# Altium PCB PCB.PcbDoc (part 6 of 10)
Units mm, origin at the board's own origin, x right, y up, seen from the top; angles counter-clockwise.
Board outline 100.5 x 147.95 mm, 6 copper layers (Top Layer, Layer 2 (GND), Layer 3, Layer 4, Layer 5 (AGND), Bottom Layer), stack 1.449 mm thick; 511 components, 297 nets, 1620 pads, 565 vias.
Unrouted connection lines stored in the file: 597.
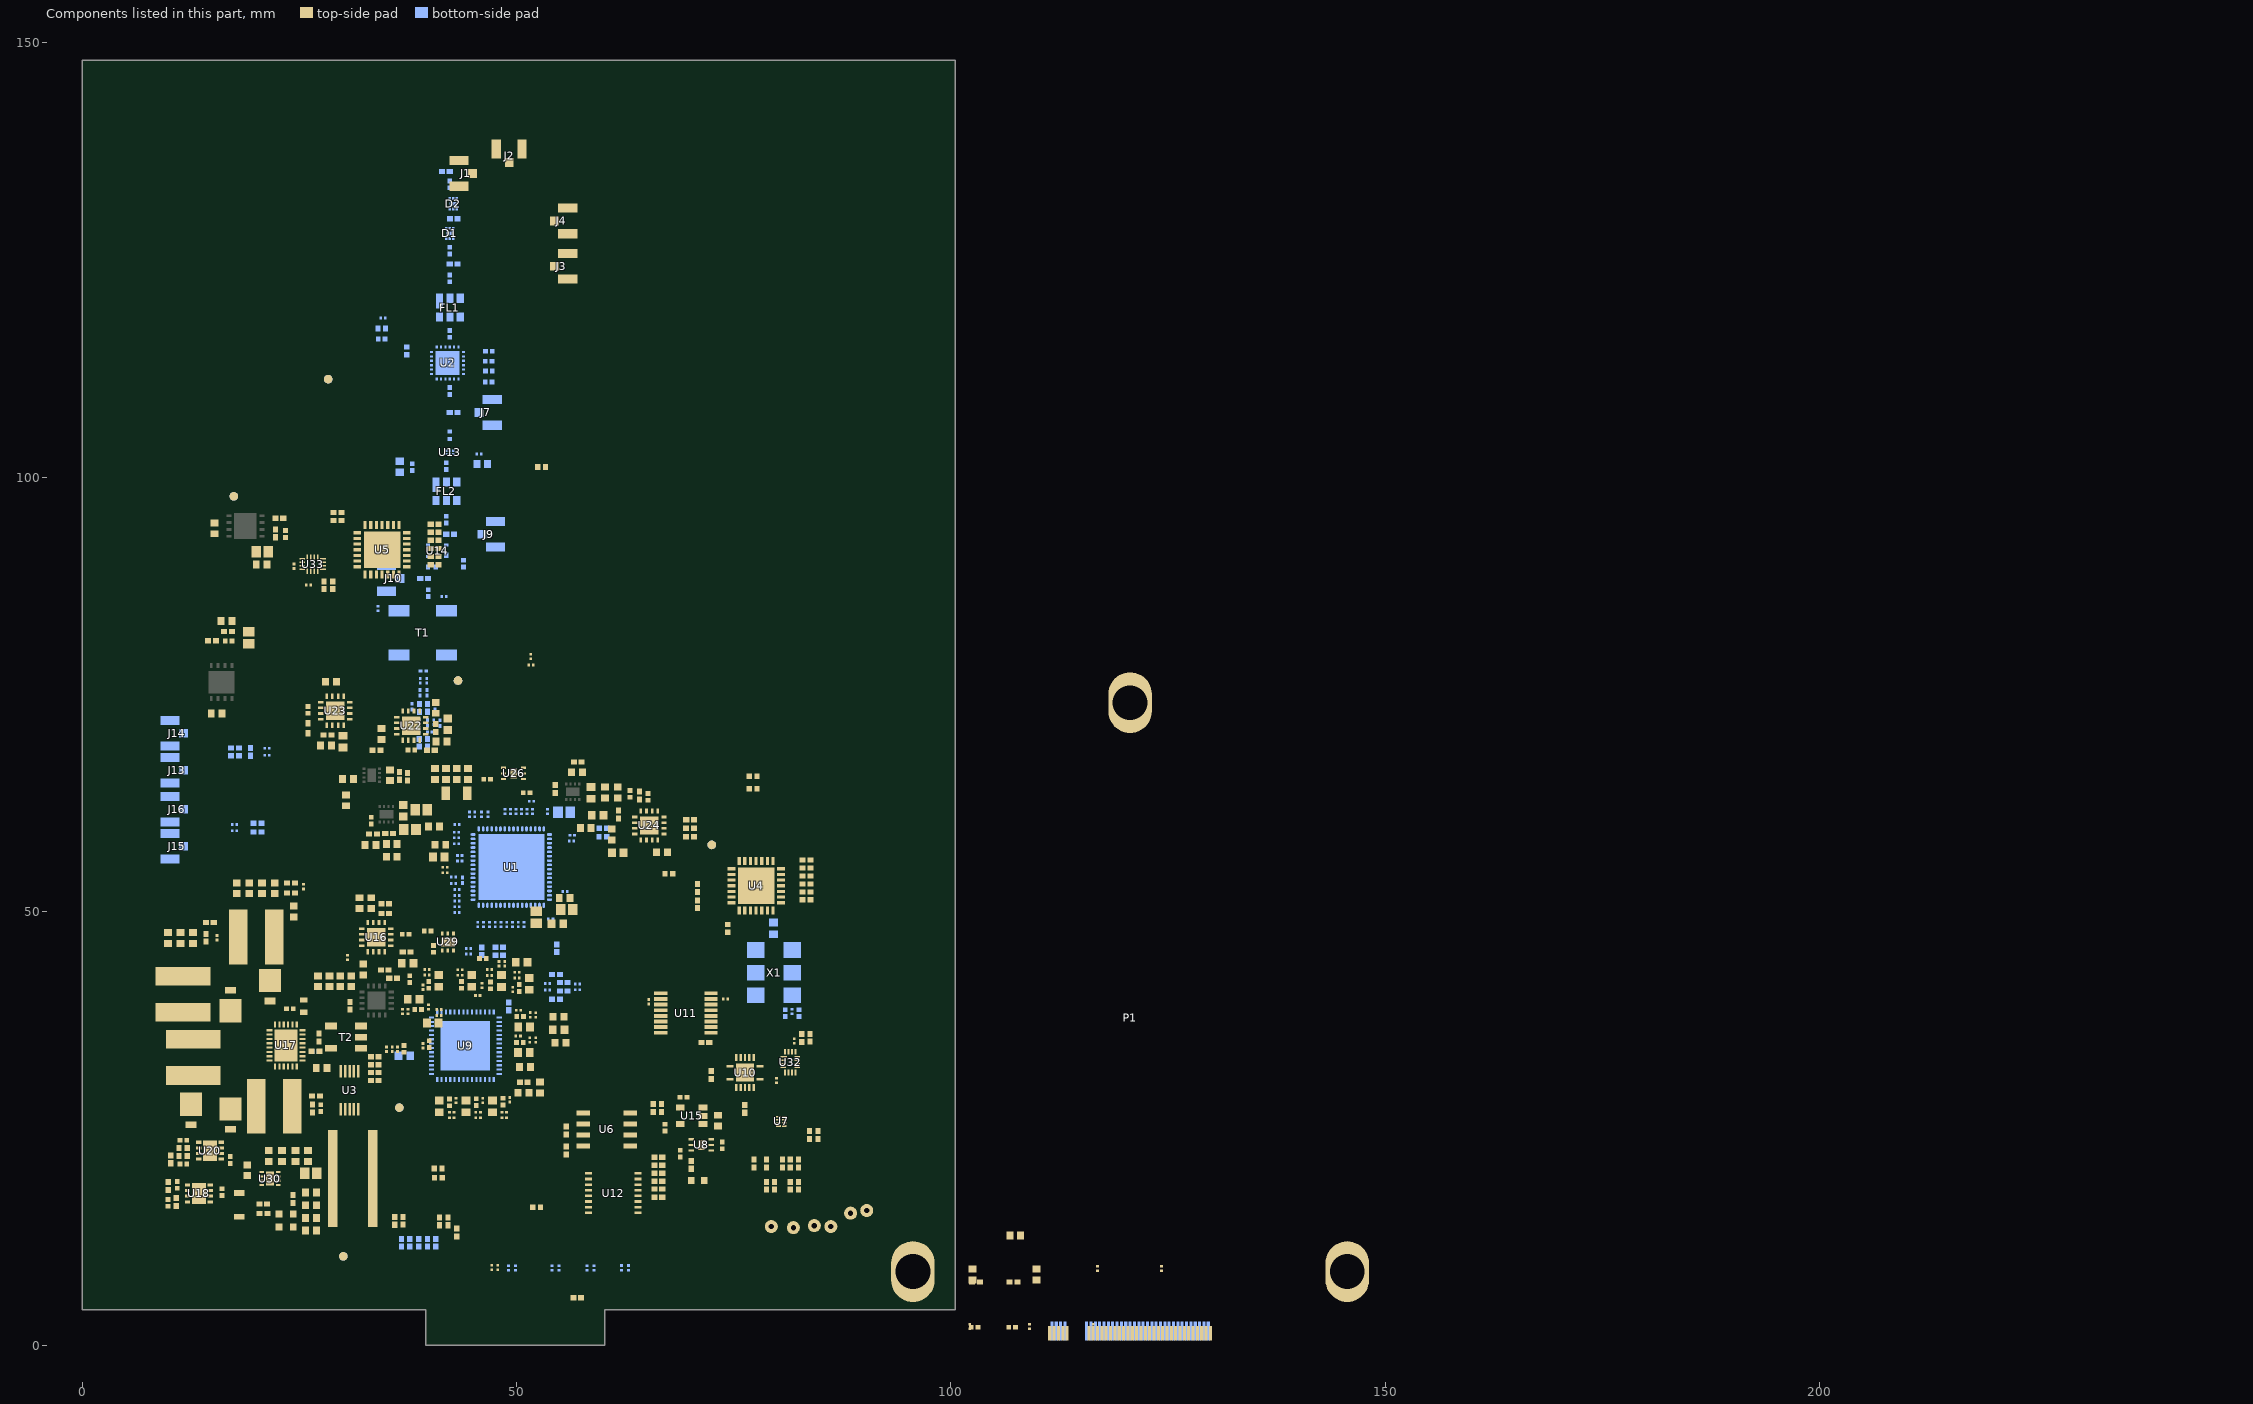
[diagram p4: the components of this part, seen from the top]

## Part data (continued)
U1: Manufacturer="Analog Devices", Manufacturer Part Number=AD9690BCPZ-500, Max Operating Temperature=85°C, Max Supply Voltage=3.4V, Min Operating Temperature=-40°C, Min Supply Voltage=3.2V, Power Dissipation=1.5W, Supplier Part Number 1=AD9690BCPZ-500-ND, ComponentLink1Description=http://www.mouser.com/ds/2/609/AD9690-534148.pdf?src-supplier=Mouser, ComponentLink1URL=http://www.mouser.com/ds/2/609/AD9690-534148.pdf?src-supplier=Mouser, ComponentLink2Description=http://www.analog.com/media/en/technical-documentation/data-sheets/AD9690.pdf?src-supplier=Digi-Key, ComponentLink2URL=http://www.analog.com/media/en/technical-documentation/data-sheets/AD9690.pdf?src-supplier=Digi-Key, ComponentLink3Description=http://www.farnell.com/datasheets/2146909.pdf?src-supplier=Element14, ComponentLink3URL=http://www.farnell.com/datasheets/2146909.pdf?src-supplier=Element14, ComponentLink4Description=http://www.analog.com/media/en/technical-documentation/data-sheets/AD9690.pdf?src-supplier=Avnet, ComponentLink4URL=http://www.analog.com/media/en/technical-documentation/data-sheets/AD9690.pdf?src-supplier=Avnet, Differential Nonlinearity=0.5LSB, Integral Nonlinearity (INL)=2.5LSB, Interface=Serial, Lead Free="Lead Free", Mount="Surface Mount", Number of A/D Converters=1, Number of Bits=14, Number of Inputs=1, Number of Pins=64, Packaging=Tray, Pricing 1="1 = 199,64000, 10 = 191,20500, 25 = 186,98720 (USD)", REACH SVHC="No SVHC", Resolution=14b, RoHS=Yes, Sampling Rate=500MS/s, Stock 1=6, Supplier 1=Digi-Key, Supply Type=Single
U2: "ANALOG DEVICES   HMC472ALP4E   RF ATTENUATOR, 3.8GHZ, 5.5V, HQFN-24", Attenuation Value=31.5dB, Case/Package=SMD/SMT, Manufacturer="Analog Devices", Max Frequency=3.8GHz, Max Input Voltage=5.5V, Max Operating Temperature=85°C, Max Power Dissipation=560mW, Min Input Voltage=4.5V, Min Operating Temperature=-40°C, Operating Supply Voltage=5V, Package Quantity=50, Supplier Part Number 1=1127-3157-ND, ComponentLink1Description=http://www.mouser.com/ds/2/609/hmc472a-879296.pdf?src-supplier=Mouser, ComponentLink1URL=http://www.mouser.com/ds/2/609/hmc472a-879296.pdf?src-supplier=Mouser, ComponentLink2Description=http://www.analog.com/media/en/technical-documentation/data-sheets/hmc472a.pdf?src-supplier=Avnet+Asia, ComponentLink2URL=http://www.analog.com/media/en/technical-documentation/data-sheets/hmc472a.pdf?src-supplier=Avnet+Asia, ComponentLink3Description=http://www.farnell.com/datasheets/1868224.pdf?src-supplier=Element14, ComponentLink3URL=http://www.farnell.com/datasheets/1868224.pdf?src-supplier=Element14, ComponentLink4Description=https://www.hittite.com/content/documents/data_sheet/hmc472alp4.pdf?src-supplier=Avnet, ComponentLink4URL=https://www.hittite.com/content/documents/data_sheet/hmc472alp4.pdf?src-supplier=Avnet, ComponentLink5Description=https://www.analog.com/media/en/technical-documentation/data-sheets/hmc472a.pdf?src-supplier=Digi-Key, ComponentLink5URL=https://www.analog.com/media/en/technical-documentation/data-sheets/hmc472a.pdf?src-supplier=Digi-Key, Contact Plating=Tin,Matte, Impedance=50R, Insertion Loss=3dB, Lead Free="Contains Lead", Manufacturer Part Number=HMC472ALP4E, Max Supply Voltage=5.5V, Min Supply Voltage=4.5V, Mount="Surface Mount", Number of Bits=6, Number of Channels=1, Number of Pins=24, Packaging="Cut Tape", Pricing 1="1 = 7,47000, 10 = 6,84400, 25 = 6,22160, 100 = 5,59940, 250 = 5,13284, 500 = 4,66620, 1000 = 4,19958 (USD)", REACH SVHC="No SVHC", RoHS=Yes, Stock 1=867, Supplier 1=Digi-Key
U3: "IC MONITOR PWR/CURR BIDIR 10MSOP", Case/Package=VSSOP, Input Bias Current=10uA, Input Offset Voltage (Vos)=2.5uV, Manufacturer="Texas Instruments", Max Operating Temperature=125°C, Max Supply Voltage=5.5V, Min Operating Temperature=-40°C, Min Supply Voltage=2.7V, Nominal Supply Current=330uA, Output Current=10mA, Package Quantity=1, Supplier Part Number 1=296-29034-1-ND, Accuracy=0.02%, Common Mode Rejection Ratio=140dB, ComponentLink1Description=https://datasheet.ciiva.com/1939/ina226-1939633.pdf?src-supplier=Digi-Key, ComponentLink1URL=https://datasheet.ciiva.com/1939/ina226-1939633.pdf?src-supplier=Digi-Key, ComponentLink2Description=https://datasheet.ciiva.com/4875/sbos547-126280-4875559.pdf?src-supplier=Mouser, ComponentLink2URL=https://datasheet.ciiva.com/4875/sbos547-126280-4875559.pdf?src-supplier=Mouser, ComponentLink3Description=https://datasheet.ciiva.com/1939/ina226-1939634.pdf?src-supplier=Digi-Key, ComponentLink3URL=https://datasheet.ciiva.com/1939/ina226-1939634.pdf?src-supplier=Digi-Key, ComponentLink4Description=https://datasheet.ciiva.com/1939/ina226-1939635.pdf?src-supplier=Digi-Key, ComponentLink4URL=https://datasheet.ciiva.com/1939/ina226-1939635.pdf?src-supplier=Digi-Key, ComponentLink5Description=https://datasheet.ciiva.com/14196/ina226-14196741.pdf?src-supplier=Avnet, ComponentLink5URL=https://datasheet.ciiva.com/14196/ina226-14196741.pdf?src-supplier=Avnet, ComponentLink6Description=https://datasheet.ciiva.com/22693/1840205-22693516.pdf?src-supplier=Element14, ComponentLink6URL=https://datasheet.ciiva.com/22693/1840205-22693516.pdf?src-supplier=Element14, Contact Plating=Gold, Lead Free="Lead Free", Manufacturer Part Number=INA226AIDGSR, Mount="Surface Mount", Number of Pins=10, Packaging="Tape and Reel", Pricing 1="1 = 2,88000, 10 = 2,58900, 100 = 2,12100, 500 = 1,80554, 1000 = 1,52275 (USD)", Radiation Hardening=No, REACH SVHC="No SVHC", RoHS=Yes, Stock 1=62024, Supplier 1=Digi-Key
U4 U5: "IC I/O EXPANDER I2C 16B 28QFN", Case/Package=QFN, Frequency=1.7MHz, Manufacturer=Microchip, Max Operating Temperature=125°C, Min Operating Temperature=-40°C, Operating Supply Voltage=5.5V, Output Current=25mA, Package Quantity=1600, Power Dissipation=700mW, Supplier Part Number 1=MCP23017T-E/MLCT-ND, ComponentLink1Description=https://datasheet.ciiva.com/1780/21952b-1780757.pdf?src-supplier=Digi-Key, ComponentLink1URL=https://datasheet.ciiva.com/1780/21952b-1780757.pdf?src-supplier=Digi-Key, ComponentLink2Description=https://datasheet.ciiva.com/16454/filehandler-aspxddocname-en023709-16454263.pdf?src-supplier=Future+Electronics, ComponentLink2URL=https://datasheet.ciiva.com/16454/filehandler-aspxddocname-en023709-16454263.pdf?src-supplier=Future+Electronics, ComponentLink3Description=https://datasheet.ciiva.com/8128/21952b-8128584.pdf?src-supplier=Avnet, ComponentLink3URL=https://datasheet.ciiva.com/8128/21952b-8128584.pdf?src-supplier=Avnet, Contact Plating=Tin,Matte, Interface=I2C,Serial, Lead Free="Lead Free", Manufacturer Part Number=MCP23017T-E/ML, Max Frequency=1.7MHz, Number of Bits=16, Number of I/Os=16, Packaging="Tape and Reel", Pricing 1="1 = 1,45000, 25 = 1,21560, 100 = 1,10210 (USD)", RoHS=Yes, Stock 1=7016, Supplier 1=Digi-Key
U6: "1.7-5.5V 1MHZ IND TMP 8-SOIC-N", Manufacturer=Microchip, Supplier Part Number 1=AT24CM02-SSHM-TCT-ND, ComponentLink1Description=http://www.microchip.com/mymicrochip/filehandler.aspx?ddocname=en589710&src-supplier=Digi-Key, ComponentLink1URL=http://www.microchip.com/mymicrochip/filehandler.aspx?ddocname=en589710&src-supplier=Digi-Key, Manufacturer Part Number=AT24CM02-SSHM-T, Pricing 1="1 = 2,51000, 25 = 2,42040, 100 = 2,41540 (USD)", RoHS=No, Stock 1=24235, Supplier 1=Digi-Key
U7: "TEXAS INSTRUMENTS   PCA9306DQER.   IC, SMBus, 5V, X2SON-8", Low Level Output Current=128mA, Manufacturer 1="Texas Instruments", Max Operating Temperature=85°C, Max Supply Voltage=5V, Min Operating Temperature=-40°C, Min Supply Voltage=0uV, Package Quantity=1, Supplier Part Number 1=296-27957-1-ND, ComponentLink1Description=https://datasheet.ciiva.com/22631/1719693-22631024.pdf?src-supplier=Element14, ComponentLink1URL=https://datasheet.ciiva.com/22631/1719693-22631024.pdf?src-supplier=Element14, ComponentLink2Description=https://datasheet.ciiva.com/1899/pca9306-1899328.pdf?src-supplier=Digi-Key, ComponentLink2URL=https://datasheet.ciiva.com/1899/pca9306-1899328.pdf?src-supplier=Digi-Key, ComponentLink3Description=https://datasheet.ciiva.com/15095/getdatasheetpartid-306496-15095555.pdf?src-supplier=Verical, ComponentLink3URL=https://datasheet.ciiva.com/15095/getdatasheetpartid-306496-15095555.pdf?src-supplier=Verical, ComponentLink4Description=https://datasheet.ciiva.com/1504/1862428-1504149.pdf?src-supplier=Element14, ComponentLink4URL=https://datasheet.ciiva.com/1504/1862428-1504149.pdf?src-supplier=Element14, ComponentLink5Description=https://datasheet.ciiva.com/1899/pca9306-1899326.pdf?src-supplier=Digi-Key, ComponentLink5URL=https://datasheet.ciiva.com/1899/pca9306-1899326.pdf?src-supplier=Digi-Key, ComponentLink6Description=https://datasheet.ciiva.com/14287/pca9306-14287374.pdf?src-supplier=Avnet, ComponentLink6URL=https://datasheet.ciiva.com/14287/pca9306-14287374.pdf?src-supplier=Avnet, ComponentLink7Description=https://datasheet.ciiva.com/14287/pca9306-14287470.pdf?src-supplier=Avnet, ComponentLink7URL=https://datasheet.ciiva.com/14287/pca9306-14287470.pdf?src-supplier=Avnet, ComponentLink8Description=https://datasheet.ciiva.com/1899/pca9306-1899327.pdf?src-supplier=Digi-Key, ComponentLink8URL=https://datasheet.ciiva.com/1899/pca9306-1899327.pdf?src-supplier=Digi-Key, ComponentLink9Description=https://datasheet.ciiva.com/26041/pca9306-26041014.pdf?src-supplier=Avnet+Europe, ComponentLink9URL=https://datasheet.ciiva.com/26041/pca9306-26041014.pdf?src-supplier=Avnet+Europe, Height=0.35mm, Lead Free="Lead Free", Length=1.45mm, Logic Function=Translator, Manufacturer Part Number 1=PCA9306DQER, Number of Bits=2, Number of Channels=2, Number of Outputs=2, Number of Pins=8, Output Type=I2C, Packaging="Tape and Reel", Pricing 1="1=0,67000, 10=0,59100, 100=0,45340, 500=0,35844, 1000=0,28675 (USD)", Propagation Delay=0.3ns, Radiation Hardening=No, REACH SVHC="No SVHC", RoHS=Yes, Stock 1=25002, Supplier 1=Digi-Key, Turn-On Delay Time=1.4ns, Width=1.05mm
U8 U26: "Ultra Low Noise, 150MA Linear Regulator For Rf/analog Circuits, 6 Pin Llp", Dropout Voltage=150mV, Manufacturer 1="Texas Instruments", Max Input Voltage=5.5V, Max Operating Temperature=125°C, Max Output Current=150mA, Min Input Voltage=2.5V, Min Operating Temperature=-40°C, Nominal Output Voltage=1.8V, Output Voltage Accuracy=2%, Package Quantity=1000, Quiescent Current=50uA, Supplier Part Number 1=LP5900SD-1.8/NOPBCT-ND, Accuracy=2%, ComponentLink1Description=https://datasheet.ciiva.com/6598/lp5900-6598182.pdf?src-supplier=Digi-Key, ComponentLink1URL=https://datasheet.ciiva.com/6598/lp5900-6598182.pdf?src-supplier=Digi-Key, ComponentLink2Description=https://datasheet.ciiva.com/6598/lp5900-6598185.pdf?src-supplier=Digi-Key, ComponentLink2URL=https://datasheet.ciiva.com/6598/lp5900-6598185.pdf?src-supplier=Digi-Key, ComponentLink3Description=https://datasheet.ciiva.com/26175/lp5900-26175289.pdf?src-supplier=Avnet+Europe, ComponentLink3URL=https://datasheet.ciiva.com/26175/lp5900-26175289.pdf?src-supplier=Avnet+Europe, ComponentLink4Description=https://datasheet.ciiva.com/6598/lp5900-6598187.pdf?src-supplier=Digi-Key, ComponentLink4URL=https://datasheet.ciiva.com/6598/lp5900-6598187.pdf?src-supplier=Digi-Key, ComponentLink5Description=https://datasheet.ciiva.com/28643/1772310-28643116.pdf?src-supplier=Element14, ComponentLink5URL=https://datasheet.ciiva.com/28643/1772310-28643116.pdf?src-supplier=Element14, ComponentLink6Description=https://datasheet.ciiva.com/14278/lp5900-14278125.pdf?src-supplier=Avnet, ComponentLink6URL=https://datasheet.ciiva.com/14278/lp5900-14278125.pdf?src-supplier=Avnet, ComponentLink7Description=https://datasheet.ciiva.com/22678/1772310-22678013.pdf?src-supplier=Element14, ComponentLink7URL=https://datasheet.ciiva.com/22678/1772310-22678013.pdf?src-supplier=Element14, Height=0.8mm, Lead Free="Lead Free", Length=2.2mm, Manufacturer Part Number 1=LP5900SD-1.8/NOPB, Mount="Surface Mount", Number of Outputs=1, Number of Pins=6, Output Current=150mA, Output Type=Fixed, Output Voltage=1.8V, Packaging="Tape and Reel", Polarity=Positive, Pricing 1="1=0.77000, 10=0.68000, 100=0.52120, 500=0.41200 (USD)", Radiation Hardening=No, REACH SVHC="No SVHC", RoHS=Yes, Stock 1=10846, Supplier 1=Digi-Key, Width=2.5mm
U9: Manufacturer="Texas Instruments", Max Operating Temperature=85°C, Min Operating Temperature=-40°C, Supplier Part Number 1=296-51339-1-ND, Manufacturer Part Number=LMK04610RTQR, Number of Inputs=2, Number of Outputs=10, Pricing 1="1 = 20,47000, 10 = 18,87700, 100 = 16,11940, 500 = 14,63474 (USD)", RoHS=No, Stock 1=2022, Supplier 1=Digi-Key
U10: "level shifter Automotive 14-Pin VQFN EP T/R", Case/Package=VQFN, High Level Output Current=16mA, Manufacturer 1="Texas Instruments", Max Operating Temperature=125°C, Min Operating Temperature=-40°C, Quiescent Current=2uA, Supplier Part Number 1=296-40546-1-ND, ComponentLink1Description=https://datasheet.ciiva.com/48438/sn74lv4t125-48438269.pdf?src-supplier=Avnet, ComponentLink1URL=https://datasheet.ciiva.com/48438/sn74lv4t125-48438269.pdf?src-supplier=Avnet, Contact Plating=Gold, Lead Free="Lead Free", Logic Function=Buffer,Inverting,Translator, Low Level Output Current=16mA, Manufacturer Part Number 1=SN74LV4T125RGYR, Mount="Surface Mount", Number of Bits=4, Number of Bits per Element=1, Number of Elements=4, Number of Pins=14, Packaging="Tape and Reel", Pricing 1="1=1.15000, 10=1.03000, 100=0.80310, 500=0.66342, 1000=0.52376 (USD)", Radiation Hardening=No, RoHS=Yes, Stock 1=74112, Supplier 1=Digi-Key
U11: Manufacturer 1="Texas Instruments", Supplier Part Number 1=296-SN74AXC4T774PWRCT-ND, Manufacturer Part Number 1=SN74AXC4T774PWR, Pricing 1="1=1,14000, 10=1,01500, 100=0,79120, 500=0,65364, 1000=0,51603 (USD)", RoHS=No, Stock 1=2000, Supplier 1=Digi-Key
U12: "IC BRIDGE SPI/I2C 16TSSOP", Manufacturer 1="NXP Semiconductors", Supplier Part Number 1=568-13691-1-ND, ComponentLink1Description=https://www.nxp.com/docs/en/data-sheet/SC18IS602B.pdf?src-supplier=Digi-Key, ComponentLink1URL=https://www.nxp.com/docs/en/data-sheet/SC18IS602B.pdf?src-supplier=Digi-Key, Manufacturer Part Number 1=SC18IS602BIPW/S8HP, Pricing 1="1=2.76000, 10=2.47600, 100=2.02860, 500=1.72690, 1000=1.45642 (USD)", RoHS=No, Stock 1=121, Supplier 1=Digi-Key
U13: Operating Frequency="1550 - 1615 MHz", Supplier Part Number 1=BGA524N6E6327XTSA1DKR-ND, Gain="16,6 dBm", Part Number=BGA524N6, Supplier 1=Digi-Key, URL=https://www.infineon.com/dgdl/Infineon-BGA524N6-DS-v03_00-en.pdf?fileId=db3a304344e406b50144e44dfad302b9
U14: Frequency="DC - 3.5GHz", Supplier Part Number 1=BGA616H6327XTSA1CT-ND, Supplier 1=Digi-Key
U15: "IC REG LINEAR 3.3V 300MA SOT23-5", Case/Package=SOT-23-5, Dropout Voltage=250mV, Manufacturer 1=Diodes, Max Input Voltage=13.2V, Max Operating Temperature=125°C, Max Output Current=300mA, Min Input Voltage=2.5V, Min Operating Temperature=-40°C, Output Voltage=3.3V, Package Quantity=1, Power Supply Rejection Ratio (PSRR)=75dB, Quiescent Current=150uA, Supplier Part Number 1=AP2210K-3.3TRG1DICT-ND, Accuracy=1%, ComponentLink1Description=http://www.mouser.com/ds/2/115/AP2210-271459.pdf?src-supplier=Mouser, ComponentLink1URL=http://www.mouser.com/ds/2/115/AP2210-271459.pdf?src-supplier=Mouser, ComponentLink2Description=http://www.alliedelec.com/m/d/24500b427815944890653ed70b5a0b32.pdf?src-supplier=Allied+Electronics, ComponentLink2URL=http://www.alliedelec.com/m/d/24500b427815944890653ed70b5a0b32.pdf?src-supplier=Allied+Electronics, ComponentLink3Description=https://www.diodes.com/assets/Datasheets/AP2210.pdf?src-supplier=Digi-Key, ComponentLink3URL=https://www.diodes.com/assets/Datasheets/AP2210.pdf?src-supplier=Digi-Key, ComponentLink4Description=http://www.diodes.com/datasheets/AP2210.pdf?src-supplier=Avnet, ComponentLink4URL=http://www.diodes.com/datasheets/AP2210.pdf?src-supplier=Avnet, Height=1.3mm, Lead Free="Lead Free", Length=3.02mm, Manufacturer Part Number 1=AP2210K-3.3TRG1, Mount="Surface Mount", Number of Outputs=1, Number of Pins=5, Number of Regulators=1, Output Current=300mA, Output Type=Fixed, Packaging="Tape and Reel", Polarity=Positive, Pricing 1="1=0.42000, 10=0.31700, 100=0.19730, 500=0.13496, 1000=0.10382 (USD)", Radiation Hardening=No, RoHS=Yes, Stock 1=89118, Supplier 1=Digi-Key, Weight=0.001058oz, Width=1.7mm
U16 U22 U23 U24: "IC REG LIN POS ADJ 2A 16LFCSP", Case/Package="LFCSP EP", Dropout Voltage=160mV, Manufacturer="Analog Devices", Max Input Voltage=3.6V, Max Operating Temperature=125°C, Max Output Current=2A, Max Output Voltage=3V, Max Supply Current=1.8mA, Min Current Limit=2.4A, Min Input Voltage=1.6V, Min Operating Temperature=-40°C, Min Output Voltage=750mV, Output Voltage Accuracy=1%, Power Supply Rejection Ratio (PSRR)=70dB, Supplier Part Number 1=ADP1741ACPZ-R7CT-ND, Accuracy=1%, ComponentLink1Description=https://datasheet.ciiva.com/2041/adp1740-1741-2041344.pdf?src-supplier=Digi-Key, ComponentLink1URL=https://datasheet.ciiva.com/2041/adp1740-1741-2041344.pdf?src-supplier=Digi-Key, ComponentLink2Description=https://datasheet.ciiva.com/15364/adp1740-1741-259394-15364336.pdf?src-supplier=Mouser, ComponentLink2URL=https://datasheet.ciiva.com/15364/adp1740-1741-259394-15364336.pdf?src-supplier=Mouser, ComponentLink3Description=https://datasheet.ciiva.com/23604/697190-23604608.pdf?src-supplier=Newark, ComponentLink3URL=https://datasheet.ciiva.com/23604/697190-23604608.pdf?src-supplier=Newark, ComponentLink4Description=https://datasheet.ciiva.com/2041/adp1740-1741-2041345.pdf?src-supplier=Digi-Key, ComponentLink4URL=https://datasheet.ciiva.com/2041/adp1740-1741-2041345.pdf?src-supplier=Digi-Key, ComponentLink5Description=https://datasheet.ciiva.com/3224/adp1740-1741-3224694.pdf?src-supplier=Avnet, ComponentLink5URL=https://datasheet.ciiva.com/3224/adp1740-1741-3224694.pdf?src-supplier=Avnet, ComponentLink6Description=https://datasheet.ciiva.com/17365/adp1740-1741-17365261.pdf?src-supplier=Avnet+Europe, ComponentLink6URL=https://datasheet.ciiva.com/17365/adp1740-1741-17365261.pdf?src-supplier=Avnet+Europe, ComponentLink7Description=https://datasheet.ciiva.com/2041/adp1740-1741-2041343.pdf?src-supplier=Digi-Key, ComponentLink7URL=https://datasheet.ciiva.com/2041/adp1740-1741-2041343.pdf?src-supplier=Digi-Key, Lead Free="Contains Lead", Manufacturer Part Number=ADP1741ACPZ-R7, Number of Outputs=1, Number of Pins=16, Number of Regulators=1, Operating Supply Current=1.8mA, Output Current=2A, Output Type=Adjustable, Output Voltage=3V, Packaging="Tape and Reel", Polarity=Positive, Pricing 1="1 = 3,42000, 10 = 3,07000, 25 = 2,90240, 100 = 2,51540, 250 = 2,38644, 500 = 2,14136 (USD)", Radiation Hardening=No, REACH SVHC="No SVHC", RoHS=Yes, Stock 1=7057, Supplier 1=Digi-Key
U17: "LINEAR TECHNOLOGY         LT3504EUFD#PBF             BUCK, QUAD, 3.2/40V, 1A, 2.2MHZ, 28QFN", Case/Package=QFN, Current - Output 1=1A, Manufacturer="Analog Devices / Linear Technology", Max Operating Temperature=125°C, Min Input Voltage=3.2V, Min Operating Temperature=-40°C, Output Voltage=40V, Package Quantity=73, Supplier Part Number 1=LT3504EUFD#PBF-ND, Switching Frequency=2.1MHz, ComponentLink1Description=https://datasheet.ciiva.com/6192/1732075-6192640.pdf?src-supplier=Farnell, ComponentLink1URL=https://datasheet.ciiva.com/6192/1732075-6192640.pdf?src-supplier=Farnell, ComponentLink2Description=https://datasheet.ciiva.com/7363/1732075-7363817.pdf?src-supplier=Newark, ComponentLink2URL=https://datasheet.ciiva.com/7363/1732075-7363817.pdf?src-supplier=Newark, Current - Output 2=1A, Lead Free="Lead Free", Manufacturer Part Number=LT3504EUFD#PBF, Number of Outputs=4, Number of Pins=28, Output Current=1A, Output Type=Adjustable, Packaging=Rail/Tube, Pricing 1="1 = 8,49000, 25 = 5,63840, 100 = 4,66200, 250 = 4,42892, 500 = 4,32900 (USD)", REACH SVHC="No SVHC", RoHS=Yes, Stock 1=1751, Supplier 1=Digi-Key, Synchronous Rectifier=No, Voltage - Output 1=40V, Voltage - Output 2=40V